# EAGLE board PCB (EAGLE 9.7.0)
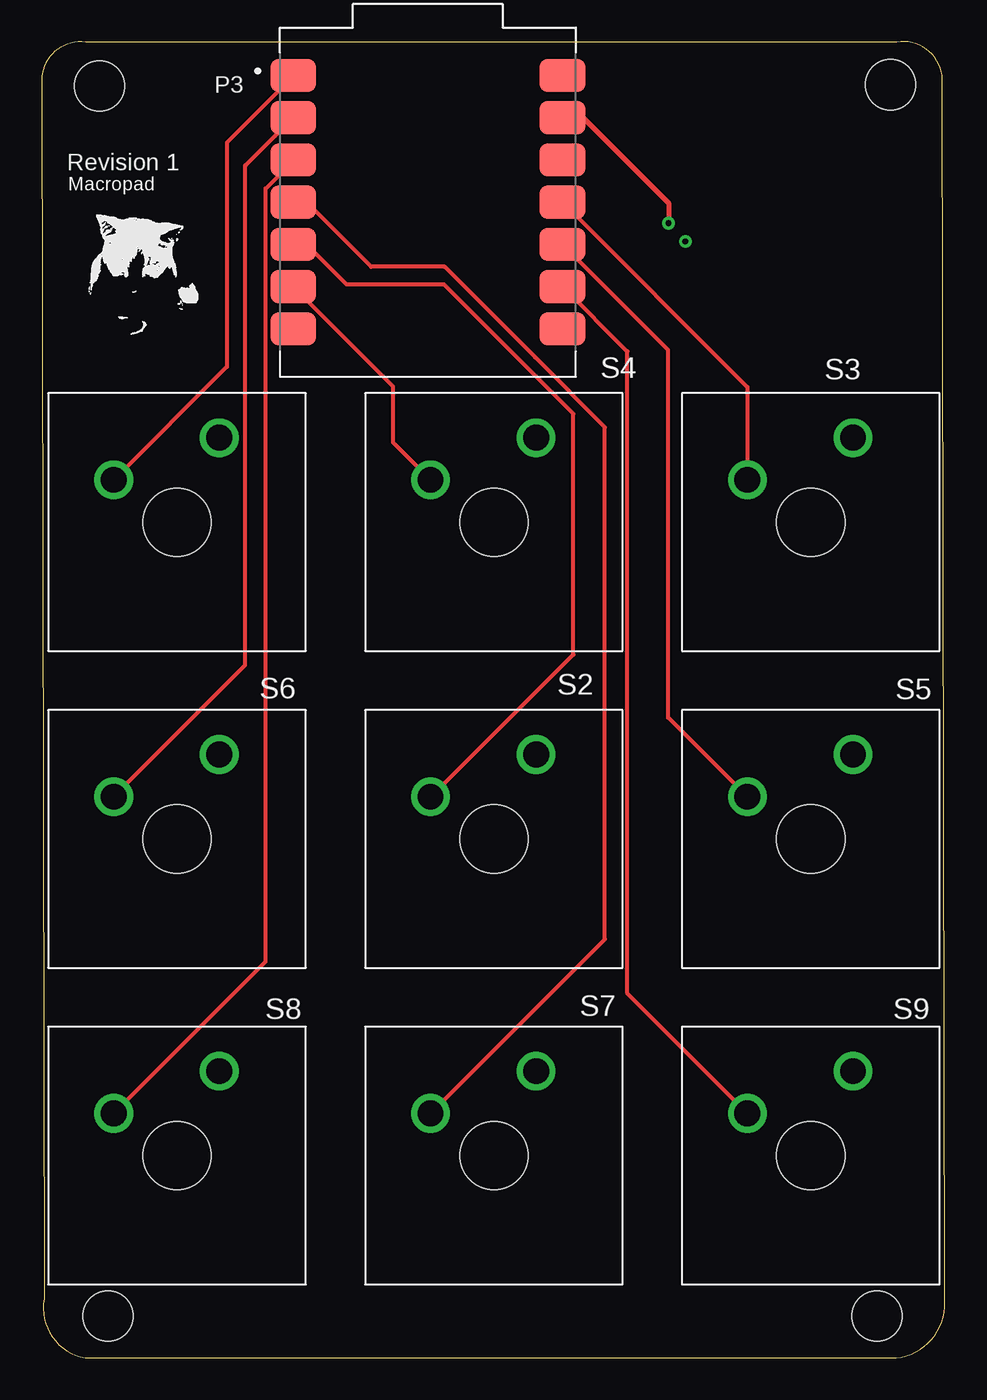
[diagram p0: board, top side]
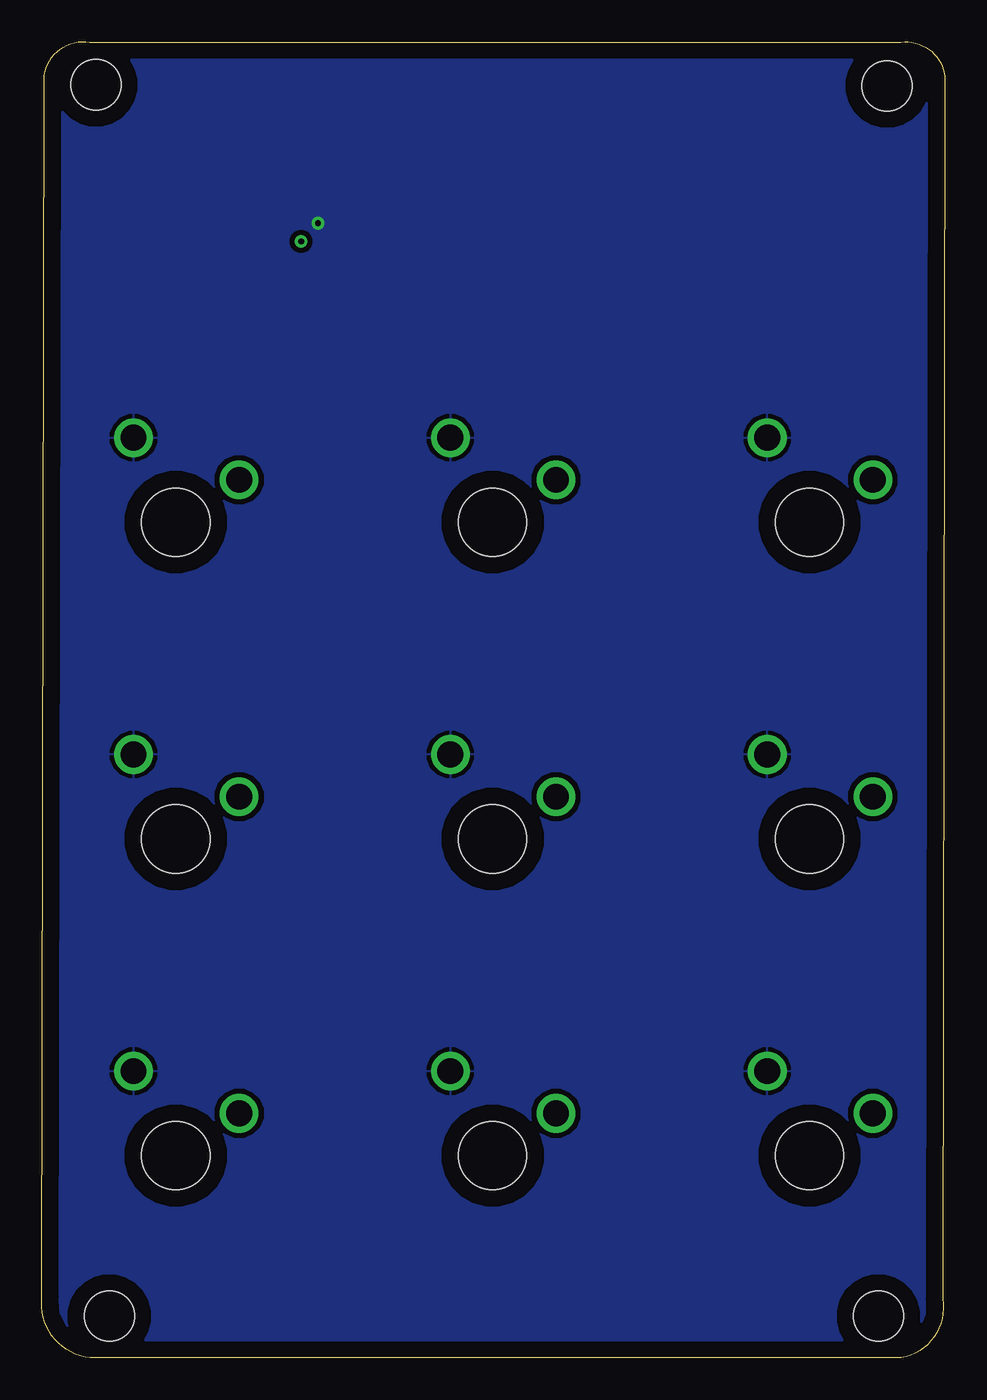
[diagram p1: board, bottom side, seen from below]

Size 54.31 x 79.17 mm. Coordinates in mm from the lower left corner, seen from the top.
Outline: 0,77.05 0.15,3.55 arc90 2.63,0 51.4,0 arc90 54.29,3.65 54.15,77.15 arc90 51.41,79.15 2.64,79.15 arc90 0,77.05
Copper layers (1*16): Top / Bottom
Stack-up 2 Layer Stack: Top SilkScreen Epoxy Ink / Top SolderMask SR:Black 0.0254mm Dk 4 / Top Surface Finish Lead-Free 0.02mm / Top CuFoil:007 0.035mm / Dielectric-1 Core:084 1.067mm / Bottom CuFoil:007 0.035mm / Bottom Surface Finish Lead-Free 0.02mm / Bottom SolderMask SR:Black 0.0254mm Dk 4 / Bottom SilkScreen Epoxy Ink
Design rules: minimum copper width 6mil, minimum drill size 0.35mm, copper clearance wire_polygon to wire_polygon 6mil, copper clearance wire_polygon to pad_smd 6mil, copper clearance wire_polygon to via 6mil, copper clearance pad_smd to pad_smd 6mil, copper clearance pad_smd to via 6mil, copper clearance via to via 6mil, copper clearance smd to pad (same net) 6mil, copper clearance smd to via (same net) 6mil, copper clearance smd to smd (same net) 6mil, dimension clearance 40mil, via restrict clearance 0mil, restrict clearance 0mil, drill distance 6mil, keepout clearance 0mil
Holes 3 mm at 3.48,76.51 51.05,76.58 50.24,2.52 4,2.52

## Footprints (pad centres in the part's own frame; a part is rotated, then mirrored left to right if it is on the bottom)
MODULE_102010428 = smd 2.75 x 2: 1 -8.1,7.62; 2 -8.1,5.08; 3 -8.1,2.54; 4 -8.1,0; 5 -8.1,-2.54; 6 -8.1,-5.08; 7 -8.1,-7.62; 8 8.1,-7.62; 9 8.1,-5.08; 10 8.1,-2.54; 11 8.1,0; 12 8.1,2.54; 13 8.1,5.08; 14 8.1,7.62
SW_MX1A-11NN = drill 1.549: 1 -3.81,2.54; 2 2.54,5.08 | hole 4.089: 0,0

## Placement (x,y rotation side)
P3  102010428'  [MODULE_102010428]  23.22,69.51 0 top
S1  MX1A-11NN  [SW_MX1A-11NN]  8.14,50.27 0 top
S2  MX1A-11NN  [SW_MX1A-11NN]  27.19,31.22 0 top
S3  MX1A-11NN  [SW_MX1A-11NN]  46.24,50.27 0 top
S4  MX1A-11NN  [SW_MX1A-11NN]  27.19,50.27 0 top
S5  MX1A-11NN  [SW_MX1A-11NN]  46.24,31.22 0 top
S6  MX1A-11NN  [SW_MX1A-11NN]  8.14,31.22 0 top
S7  MX1A-11NN  [SW_MX1A-11NN]  27.19,12.17 0 top
S8  MX1A-11NN  [SW_MX1A-11NN]  8.14,12.17 0 top
S9  MX1A-11NN  [SW_MX1A-11NN]  46.24,12.17 0 top

## Library data of the parts
P3 = RP2040_Schematic; AVAILABILITY: In Stock; CHECK_PRICES: https://www.snapeda.com/parts/102010428/Seeed+Studio/view-part/?ref=eda; DESCRIPTION: RP2040 XIAO RP2040 series ARM® Cortex®-M0+ MCU 32-Bit Embedded Evaluation Board; MF: Seeed Technology Co., Ltd; MP: 102010428; PACKAGE: None; PRICE: None; PURCHASE-URL: https://www.snapeda.com/api/url_track_click_mouser/?unipart_id=6588972&manufacturer=Seeed Technology Co., Ltd&part_name=102010428&search_term=rp2040; SNAPEDA_LINK: https://www.snapeda.com/parts/102010428/Seeed+Studio/view-part/?ref=snap
S1-S9 = MX1A-11NN; AVAILABILITY: In Stock; CHECK_PRICES: https://www.snapeda.com/parts/MX1A11NN/Cherry/view-part/?ref=eda; DESCRIPTION: SWITCH, TACTILE, SPST-NO, 10mA, THOUGH HOLE; Product Range:MX Series; Actuator Orientation:Top Actuated; Switch Mounting:Surface Mount; Actuator Style:Plunger for Cap; Actuating Force:59.5gf; Contact Rating:10mA at 12VDC RoHS Compliant: No; MF: Cherry; MP: MX1A11NN; PACKAGE: None; PRICE: None; PURCHASE-URL: https://www.snapeda.com/api/url_track_click_mouser/?unipart_id=7732384&manufacturer=Cherry&part_name=MX1A11NN&search_term=mx cherry; SNAPEDA_LINK: https://www.snapeda.com/parts/MX1A11NN/Cherry/view-part/?ref=snap

## Nets
3V3: P3.12
5V: P3.14
D8: P3.9 S9.1
D9: P3.10 S5.1
D10: P3.11 S3.1
GND: P3.13 S1.2 S2.2 S3.2 S4.2 S5.2 S6.2 S7.2 S8.2 S9.2
P6: P3.5 S2.1
P7: P3.6 S4.1
P26: P3.1 S1.1
P27: P3.2 S6.1
P28: P3.3 S8.1
P29: P3.4 S7.1

## Tracks (layer width: path | path; a pad name or v marks a point on that pad's centre or on a via)
D8
  Top 0.254: S9.1 35.22,21.92 35.22,60.53 P3.9
D9
  Top 0.254: S5.1 37.68,38.52 37.68,60.62 P3.10
D10
  Top 0.254: S3.1 42.44,58.4 P3.11
GND  (via drill 0.35)
  Top 0.305: P3.13 32.56,74.59 37.7,69.46 v37.7,68.25 | v37.7,68.25
  pour Bottom (isolate 0.305): 0.15,3.55 0,77.05 arc-90 2.64,79.15 51.41,79.15 arc-90 54.15,77.15 54.29,3.65 arc-90 51.4,0 2.63,0 arc-90
N$1  (via drill 0.35)
  other vias: 38.71,67.16
P6
  Top 0.152: S2.1 23.43,33.76
  Top 0.254: 23.43,33.76 31.98,42.31 31.98,56.79 24.21,64.56 18.34,64.56 15.93,66.97 P3.5
P7
  Top 0.254: S4.1 21.13,55.06 21.13,58.42 P3.6
P26
  Top 0.254: 15.63,77.77 15.46,77.6 15.46,77.51 | 15.46,77.51 15.12,77.17 P3.1 | S1.1 11.15,59.62 11.15,73.09 15.46,77.41 15.46,77.51
P27
  Top 0.254: S6.1 12.24,41.67 12.24,71.71 P3.2
P28
  Top 0.254: P3.3 15.12,71.99 13.47,70.33 13.47,23.84 S8.1
P29
  Top 0.152: 24.37,15.69 23.45,14.77 | 23.45,14.77 S7.1 | 23.45,14.77 23.46,14.77
  Top 0.254: 23.46,14.77 33.87,25.18 33.87,55.98 29.67,60.18 29.67,60.19 24.23,65.63 19.81,65.63 15.93,69.51 P3.4

## Text on the board
SilkscreenTop: Revision 1 | Macropad